# Altium PCB ZZ_KOM_ACB23_4009.PcbDoc (part 3 of 3)
Units mil, origin at the board's own origin, x right, y up, seen from the top; angles counter-clockwise.
Board outline 3937.01 x 2755.91 mil, 4 copper layers (Top Layer, Signal Layer 1, Signal Layer 2, Bottom Layer), stack 63.662 mil thick; 118 components, 212 nets, 909 pads, 347 vias.
Unrouted connection lines stored in the file: 40.
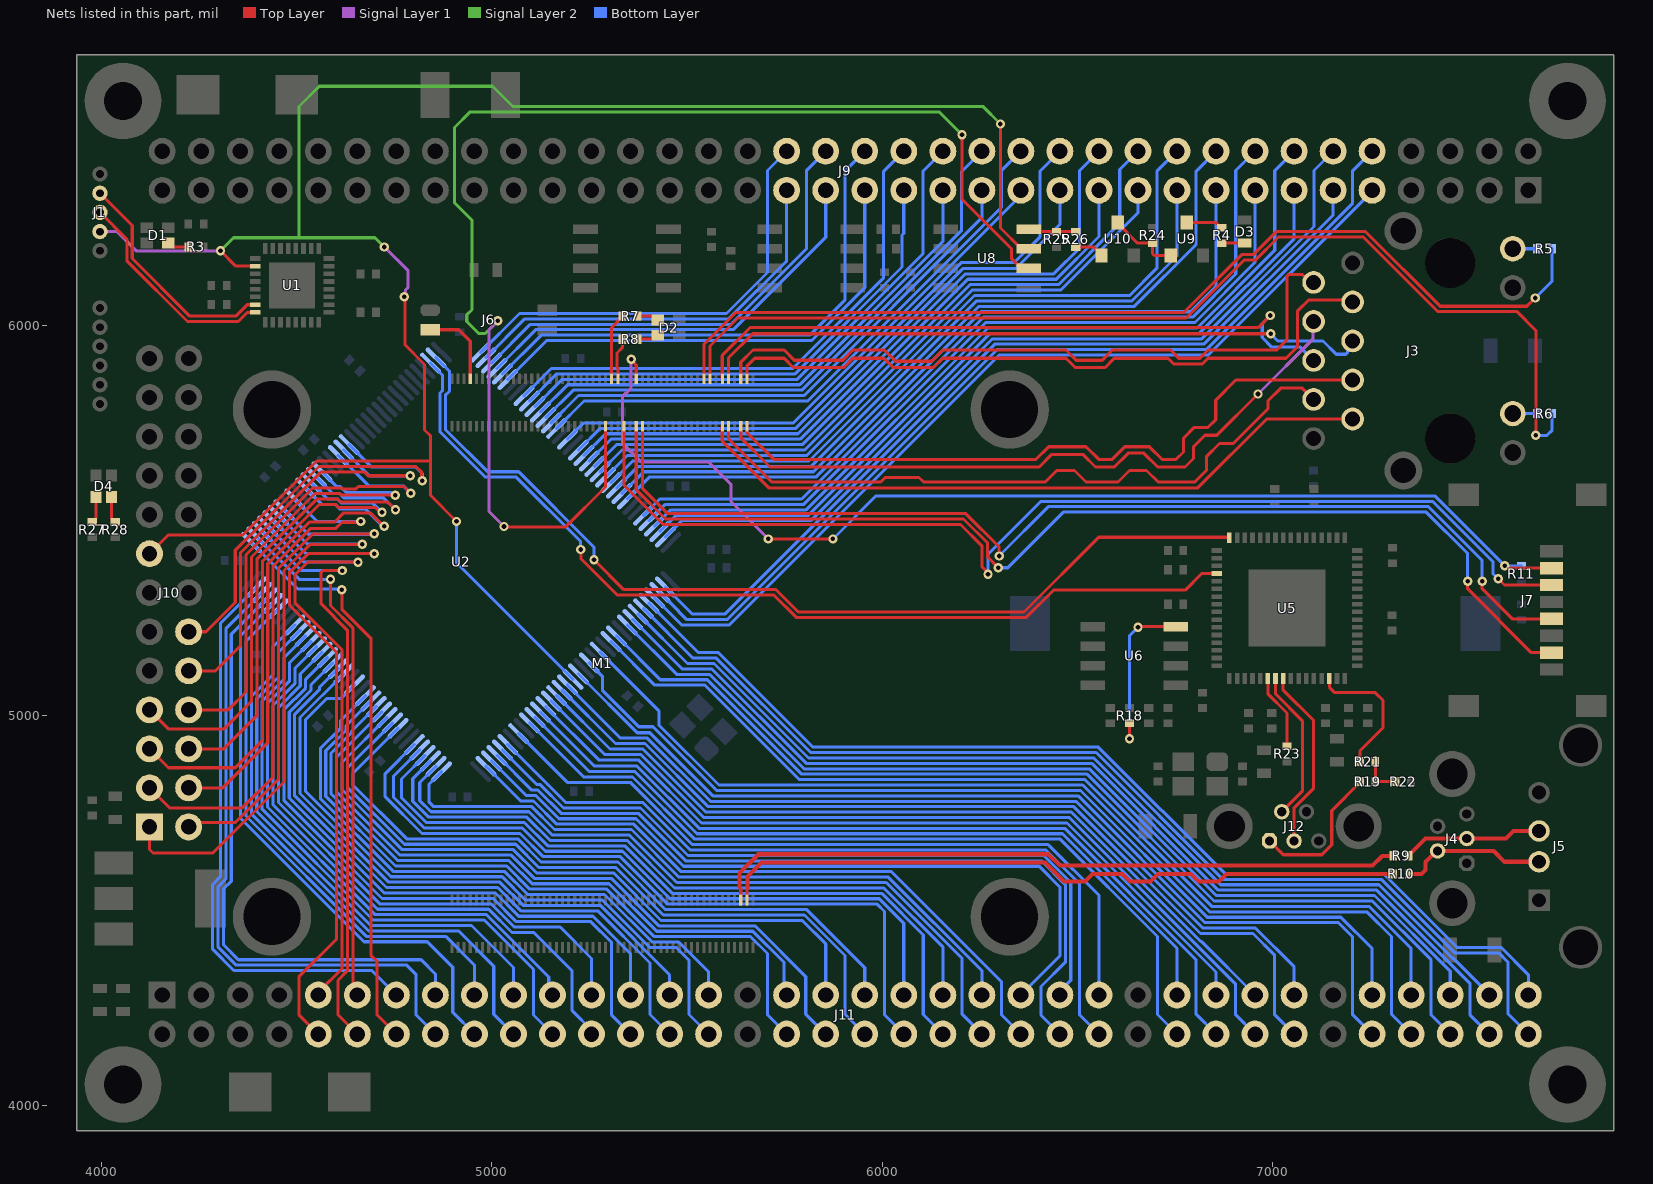
[diagram p5: the nets of this part, all layers, seen from the top]

## Via types
v1: diameter 24.02, hole 11.81, Top Layer to Bottom Layer, tented both sides, 347 vias

## Nets (pads, with @x,y where several pads share a name; then routed paths per layer and width w, separated by ;. In a path a pad name is that pad's centre, name@x,y a point inside that pad or via, vN(x,y) a via of type N, cw(c..) or ccw(c..) an arc to the next point about the centre after c; other vN are vias at no path point) (continued)
NetD1_4: D1.4 R3.2 | length 55.3
  Top Layer w7.87: D1.4@4171.26,6210.63 4181.1,6200.79 R3.2@4222.44,6200.79
NetD2_3: D2.3 R8.2 | length 55.3
  Top Layer w7.87: R8.2@5374.02,5964.57 5415.35,5964.57 D2.3@5425.2,5974.41
NetD2_4: D2.4 R7.2 | length 55.3
  Top Layer w7.87: R7.2@5374.02,6023.62 5415.35,6023.62 D2.4@5425.2,6013.78
NetD3_2: D3.2 R4.1 | length 59.1
  Top Layer w7.87: R4.1@6870.08,6210.63 D3.2@6929.13,6210.63
NetD4_3: D4.3 R28.2 | length 69.3
  Top Layer w7.87: D4.3@4025.59,5560.22 4025.59,5505.95 4027.56,5503.98 4027.56,5502.02 4033.46,5496.11 R28.2@4035.43,5496.11
NetD4_4: D4.4 R27.2 | length 69.3
  Top Layer w7.87: R27.2@3976.38,5496.11 3978.35,5496.11 3984.25,5502.02 3984.25,5503.98 3986.22,5505.95 D4.4@3986.22,5560.22
NetJ3_12: J3.12 R6.2 | length 61.4
  Bottom Layer w7.87: J3.12@7615.75,5773.82 R6.2@7677.17,5773.82
NetJ3_14: J3.14 R5.2 | length 61.4
  Bottom Layer w7.87: J3.14@7615.75,6196.26 R5.2@7677.17,6196.26
NetJ4_2: J4.2 J5.2 R10.2 | length 382.2
  Top Layer w10.63: R10.2@7349.21,4594.49 7381.89,4594.49 7391.95,4604.55 7391.95,4625.59 7419.91,4653.54 J4.2@7423.23,4653.54 7566.93,4653.54 7594.88,4625.59 J5.2@7683.07,4625.59
NetJ4_3: J4.3 J5.3 R9.2 | length 361.3
  Top Layer w10.63: R9.2@7349.21,4640.84 7349.21,4642.81 7353.74,4647.34 7354.25,4647.34 7391.95,4685.04 J4.3@7498.03,4685.04 7537.4,4685.04 7598.43,4685.04 7617.72,4704.33 J5.3@7683.07,4704.33
NetJ6_L2: J6.L2 M1.93 | length 211.3
  Top Layer w7.87: J6.L2@4842.13,5988.78 4915.53,5988.78 4944.88,5959.43 M1.93@4944.88,5862.99
NetJ9_9: J9.9 U2.40 | length 2330.4
  Bottom Layer w7.87: U2.40@5416.79,5301.83 5486.39,5232.24 5608.29,5232.24 6299.97,5923.91 6835.88,5923.91 7255.51,6343.55 J9.9@7255.51,6346.06
NetJ9_10: J9.10 U2.39 | length 2399.7
  Bottom Layer w7.87: U2.39@5430.71,5315.75 5479.32,5267.14 5479.32,5266.42 5499.63,5246.11 5602.54,5246.11 6294.22,5937.79 6830.13,5937.79 7205.51,6313.17 7205.51,6396.06 J9.10@7255.51,6446.06
NetJ9_11: J9.11 U2.38 | length 2226.7
  Bottom Layer w7.87: U2.38@5444.63,5329.67 5514.32,5259.98 5596.8,5259.98 6288.47,5951.66 6824.39,5951.66 7155.51,6282.79 J9.11@7155.51,6346.06
NetJ9_12: J9.12 U2.35 | length 2204.4
  Bottom Layer w7.87: U2.35@5444.63,5457.73 5486.57,5499.67 5816.86,5499.67 6282.73,5965.54 6818.64,5965.54 7106.3,6253.2 7106.3,6396.85 J9.12@7155.51,6446.06
NetJ9_13: J9.13 U2.34 | length 2059.7
  Bottom Layer w7.87: U2.34@5430.71,5471.65 5472.61,5513.54 5811.12,5513.54 6276.98,5979.41 6812.89,5979.41 7055.51,6222.03 J9.13@7055.51,6346.06
NetJ9_14: J9.14 U2.33 | length 2156.3
  Bottom Layer w7.87: U2.33@5416.79,5485.57 5458.64,5527.42 5805.37,5527.42 6271.23,5993.28 6807.15,5993.28 7005.91,6192.04 7005.91,6396.46 J9.14@7055.51,6446.06
NetJ9_15: J9.15 U2.32 | length 2011.6
  Bottom Layer w7.87: U2.32@5402.87,5499.49 5444.68,5541.29 5799.62,5541.29 6265.49,6007.16 6801.4,6007.16 6955.51,6161.27 J9.15@6955.51,6346.06
NetJ9_16: J9.16 U2.31 | length 2108.2
  Bottom Layer w7.87: U2.31@5388.95,5513.41 5430.71,5555.17 5793.88,5555.17 6259.74,6021.03 6795.65,6021.03 6906,6131.38 6906,6396.55 J9.16@6955.51,6446.06
NetJ9_17: J9.17 U2.28 | length 1979.8
  Bottom Layer w7.87: U2.28@5347.19,5555.17 5403.01,5610.98 5830.07,5610.98 6253.99,6034.91 6789.91,6034.91 6855.51,6100.51 J9.17@6855.51,6346.06
NetJ9_18: J9.18 U2.27 | length 1995.6
  Bottom Layer w7.87: U2.27@5333.27,5569.09 5389.04,5624.85 5824.32,5624.85 6248.25,6048.78 6646.12,6048.78 6804.63,6207.28 6804.63,6395.18 J9.18@6855.51,6446.06
NetJ9_19: J9.19 U2.26 | length 1850.8
  Bottom Layer w7.87: U2.26@5319.36,5583.01 5375.08,5638.73 5818.58,5638.73 6242.5,6062.65 6640.38,6062.65 6755.51,6177.79 J9.19@6755.51,6346.06
NetJ9_20: J9.20 U2.25 | length 1947.5
  Bottom Layer w7.87: U2.25@5305.44,5596.92 5361.11,5652.6 5812.83,5652.6 6236.75,6076.53 6634.63,6076.53 6704,6145.9 6704,6394.55 J9.20@6755.51,6446.06
NetJ9_21: J9.21 U2.24 | length 1702.4
  Bottom Layer w7.87: U2.24@5291.52,5610.84 5347.33,5666.66 5807.26,5666.66 6231.01,6090.4 6457.64,6090.4 6655.51,6288.27 J9.21@6655.51,6346.06
NetJ9_22: J9.22 U2.23 | length 1799
  Bottom Layer w7.87: U2.23@5277.6,5624.76 5333.37,5680.53 5801.52,5680.53 6225.26,6104.28 6451.9,6104.28 6608.87,6261.25 6608.87,6399.42 J9.22@6655.51,6446.06
NetJ9_23: J9.23 U2.22 | length 1654.3
  Bottom Layer w7.87: U2.22@5263.68,5638.68 5319.4,5694.41 5795.77,5694.41 6219.51,6118.15 6446.15,6118.15 6555.51,6227.51 J9.23@6555.51,6346.06
NetJ9_24: J9.24 U2.21 | length 1750.6
  Bottom Layer w7.87: U2.21@5249.76,5652.6 5305.44,5708.28 5790.02,5708.28 6213.77,6132.02 6439.88,6132.02 6506,6198.15 6506,6396.55 J9.24@6555.51,6446.06
NetJ9_25: J9.25 U2.20 | length 1552.6
  Bottom Layer w7.87: U2.20@5235.84,5666.52 5291.65,5722.34 5784.46,5722.34 6208.02,6145.9 6343.24,6145.9 6455.51,6258.17 J9.25@6455.51,6346.06
NetJ9_26: J9.26 U2.19 | length 1649.3
  Bottom Layer w7.87: U2.19@5221.92,5680.44 5277.69,5736.21 5778.71,5736.21 6203.77,6161.27 6338.99,6161.27 6405,6227.28 6405,6395.55 J9.26@6455.51,6446.06
NetJ9_27: J9.27 U2.17 | length 1433.5
  Bottom Layer w7.87: U2.17@5194.08,5708.28 5235.88,5750.08 5772.97,5750.08 6355.51,6332.63 J9.27@6355.51,6346.06
NetJ9_28: J9.28 U2.15 | length 1538.3
  Bottom Layer w7.87: U2.15@5166.24,5736.12 5236.32,5806.2 5809.46,5806.2 6305.23,6301.96 6305.23,6395.78 J9.28@6355.51,6446.06
NetJ9_29: J9.29 U2.14 | length 1391.5
  Bottom Layer w7.87: U2.14@5152.32,5750.04 5222.36,5820.07 5800.17,5820.07 6255.51,6275.41 J9.29@6255.51,6346.06
NetJ9_30: J9.30 U2.13 | length 1488.1
  Bottom Layer w7.87: U2.13@5138.4,5763.96 5208.39,5833.94 5794.43,5833.94 6203.77,6243.29 6203.77,6394.32 J9.30@6255.51,6446.06
NetJ9_31: J9.31 U2.12 | length 1343.4
  Bottom Layer w7.87: U2.12@5124.48,5777.88 5194.43,5847.82 5788.68,5847.82 6155.51,6214.65 J9.31@6155.51,6346.06
NetJ9_32: J9.32 U2.11 | length 1440
  Bottom Layer w7.87: U2.11@5110.56,5791.8 5180.46,5861.69 5782.93,5861.69 6104.62,6183.38 6104.62,6395.17 J9.32@6155.51,6446.06
NetJ9_33: J9.33 U2.10 | length 1295.3
  Bottom Layer w7.87: U2.10@5096.64,5805.72 5166.5,5875.57 5777.19,5875.57 6050.89,6149.27 6050.89,6231.26 6055.51,6235.88 J9.33@6055.51,6346.06
NetJ9_34: J9.34 U2.9 | length 1391.9
  Bottom Layer w7.87: U2.9@5082.73,5819.64 5152.53,5889.44 5771.44,5889.44 6004,6122 6004,6394.55 J9.34@6055.51,6446.06
NetJ9_35: J9.35 U2.6 | length 1261.5
  Bottom Layer w7.87: U2.6@5040.97,5861.39 5140.63,5961.06 5820.07,5961.06 5955.51,6096.5 J9.35@5955.51,6346.06
NetJ9_36: J9.36 U2.5 | length 1358.2
  Bottom Layer w7.87: U2.5@5027.05,5875.31 5126.66,5974.93 5814.33,5974.93 5905.18,6065.78 5905.18,6395.73 J9.36@5955.51,6446.06
NetJ9_37: J9.37 U2.4 | length 1102.1
  Bottom Layer w7.87: U2.4@5013.13,5889.23 5112.7,5988.8 5618.61,5988.8 5855.51,6225.7 J9.37@5855.51,6346.06
NetJ9_38: J9.38 U2.3 | length 1198.8
  Bottom Layer w7.87: U2.3@4999.21,5903.15 5098.73,6002.68 5612.87,6002.68 5805.84,6195.65 5805.84,6396.39 J9.38@5855.51,6446.06
NetJ9_39: J9.39 U2.2 | length 1054
  Bottom Layer w7.87: U2.2@4985.29,5917.07 5084.77,6016.55 5607.12,6016.55 5755.51,6164.94 J9.39@5755.51,6346.06
NetJ9_40: J9.40 U2.1 | length 1150.7
  Bottom Layer w7.87: U2.1@4971.37,5930.99 5070.8,6030.43 5601.37,6030.43 5706.34,6135.39 5706.34,6396.89 J9.40@5755.51,6446.06
NetJ10_1: J10.1 U2.114 | length 1496.4
  Top Layer w7.87: J10.1@4123.22,4714.96 4123.22,4657.03 4132.26,4648 4285.5,4648 4467.56,4830.07 4467.56,5372 4534.52,5438.95 4667.72,5438.95 v1(4667.78,5438.89)
  Bottom Layer w7.87: U2.114@4453.57,5513.41 4527.09,5439.88 4643.96,5439.88 ; 4643.96,5439.87 4666.8,5439.87 v1(4667.78,5438.89)
NetJ10_2: J10.2 U2.115 | length 1360.3
  Top Layer w7.87: J10.2@4223.22,4714.96 4234.54,4726.27 4342.7,4726.27 4453.69,4837.26 4453.69,5377.74 4541.82,5465.88 v1(4698.54,5465.88)
  Bottom Layer w7.87: U2.115@4467.49,5527.33 4529.98,5464.83 4697.5,5464.83 v1(4698.54,5465.88)
NetJ10_3: J10.3 U2.117 | length 1375.9
  Top Layer w7.87: J10.3@4123.22,4814.96 4174.41,4763.78 4360.52,4763.78 4439.82,4843.07 4439.82,5383.49 4536.08,5479.75 4600.44,5479.75 4616.28,5495.59 4662.42,5495.59 v1(4664.42,5497.59)
  Bottom Layer w7.87: U2.117@4495.33,5555.17 4552.9,5497.59 v1(4664.42,5497.59)
NetJ10_4: J10.4 U2.119 | length 1317.6
  Top Layer w7.87: J10.4@4223.22,4814.96 4310.58,4814.96 4425.94,4930.32 4425.94,5389.24 4532.51,5495.8 4596.87,5495.8 4620.6,5519.54 4688.96,5519.54 4722.92,5485.57 v1(4724.44,5485.57)
  Bottom Layer w7.87: U2.119@4523.16,5583.01 4564.69,5541.48 4598.66,5541.48 4609.94,5530.2 4675.52,5530.2 4720.14,5485.57 v1(4724.44,5485.57)
NetJ10_5: J10.5 U2.120 | length 1385.7
  Top Layer w7.87: J10.5@4123.22,4914.96 4171.71,4866.48 4342.48,4866.48 4412.07,4936.07 4412.07,5394.98 4558.57,5541.48 4598.66,5541.48 4606.73,5533.41 4701.75,5533.41 4714.33,5520.83 v1(4718.69,5520.83)
  Bottom Layer w7.87: U2.120@4537.08,5596.92 4578.65,5555.35 4604.4,5555.35 4615.32,5544.44 4695.09,5544.44 v1(4718.69,5520.83)
NetJ10_6: J10.6 U2.121 | length 1278.4
  Top Layer w7.87: J10.6@4223.22,4914.96 4313.47,4914.96 4398.19,4999.68 4398.19,5400.73 4552.82,5555.35 4604.4,5555.35 4612.48,5547.28 4733.31,5547.28 v1(4753.17,5527.42)
  Bottom Layer w7.87: U2.121@4551,5610.84 4592.62,5569.23 4610.15,5569.23 4621.06,5558.31 4722.28,5558.31 v1(4753.17,5527.42)
NetJ10_7: J10.7 U2.122 | length 1329.9
  Top Layer w7.87: J10.7@4123.22,5014.96 4172.6,4965.58 4313.01,4965.58 4384.32,5036.89 4384.32,5406.48 4547.07,5569.23 4610.15,5569.23 4614.36,5565.02 v1(4752.3,5565.02)
  Bottom Layer w7.87: U2.122@4564.92,5624.76 4602.85,5586.84 4612.16,5586.84 4626.81,5572.19 4740.77,5572.19 4747.93,5565.02 v1(4752.3,5565.02)
NetJ10_8: J10.8 U2.125 | length 1246.1
  Top Layer w7.87: J10.8@4223.22,5014.96 4324.64,5014.96 4370.45,5060.76 4370.45,5412.22 4541.33,5583.1 4615.9,5583.1 4618.26,5580.74 4651.8,5580.74 4658.03,5586.97 4775.24,5586.97 v1(4792.15,5570.06)
  Bottom Layer w7.87: U2.125@4606.68,5666.52 4684.56,5588.64 4773.56,5588.64 v1(4792.15,5570.06)
NetJ10_10: J10.10 U2.126 | length 1120.2
  Top Layer w7.87: J10.10@4223.22,5114.96 4291.96,5114.96 4356.57,5179.57 4356.57,5417.97 4563.23,5624.63 4673.55,5624.63 4683.56,5614.61 v1(4790.96,5614.61)
  Bottom Layer w7.87: U2.126@4620.6,5680.44 4686.41,5614.63 v1@4790.94,5614.63
NetJ10_12: J10.12 U2.127 | length 1116.4
  Top Layer w7.87: J10.12@4223.22,5214.96 4267.96,5214.96 4342.7,5289.7 4342.7,5423.72 4557.48,5638.5 4805.4,5638.5 4820.3,5623.6 4820.3,5602.87 v1(4821.37,5601.8)
  Bottom Layer w7.87: U2.127@4634.52,5694.36 4692.32,5636.56 4805.79,5636.56 4821.99,5620.36 4821.99,5602.42 v1(4821.37,5601.8)
NetJ11_9: J11.9 U2.112 | length 1597.3
  Top Layer w7.87: J11.9@4555.51,4284.25 4555.51,4291.13 4616.2,4351.82 4616.2,5168.57 4495.31,5289.46 4495.31,5360.5 4528.51,5393.7 4656.39,5393.7 v1(4657.19,5392.89)
  Bottom Layer w7.87: U2.112@4425.73,5485.57 4517.6,5393.7 4656.39,5393.7 v1(4657.19,5392.89)
NetJ11_10: J11.10 U2.113 | length 1823.9
  Top Layer w7.87: J11.10@4555.51,4184.25 4505.73,4234.03 4505.73,4330.73 4602.33,4427.33 4602.33,5162.83 4481.44,5283.72 4481.44,5366.25 4530.15,5414.96 v1(4698.54,5414.96)
  Bottom Layer w7.87: U2.113@4439.65,5499.49 4524.18,5414.96 v1(4698.54,5414.96)
NetJ11_11: J11.11 U2.110 | length 1327.3
  Top Layer w7.87: v1@4586.6,5349.19 4586.6,5282.27 4643.95,5224.92 4643.95,4295.81 J11.11@4655.51,4284.25
  Bottom Layer w7.87: U2.110@4397.89,5457.73 4506.43,5349.19 v1(4586.76,5349.19)
NetJ11_12: J11.12 U2.111 | length 1543.6
  Top Layer w7.87: v1(4616.89,5371.76) 4567.47,5371.76 4562.85,5367.14 4562.85,5286.4 4630.08,5219.17 4630.08,4346.08 4606.02,4322.02 4606.02,4233.74 J11.12@4655.51,4184.25
  Bottom Layer w7.87: U2.111@4411.81,5471.65 4511.7,5371.76 v1(4616.89,5371.76)
NetJ11_13: J11.13 U2.107 | length 1494.2
  Bottom Layer w7.87: U2.107@4397.89,5329.67 4330.71,5262.49 4330.71,5262.19 4304.66,5236.14 4304.66,4587.35 4284.97,4567.66 4284.97,4401.24 4339.25,4346.96 4692.8,4346.96 J11.13@4755.51,4284.25
NetJ11_14: J11.14 U2.109 | length 1478.5
  Top Layer w7.87: v1(4615.9,5322.83) 4615.9,5272.59 4690,5198.49 4690,4386.53 4706.45,4370.08 4706.45,4233.32 J11.14@4755.51,4184.25
  Bottom Layer w7.87: U2.109@4383.97,5443.81 4503.21,5324.57 4614.16,5324.57 v1(4615.9,5322.83)
NetJ11_15: J11.15 U2.105 | length 1563.5
  Bottom Layer w7.87: U2.105@4425.73,5301.83 4332.41,5208.51 4332.41,4575.86 4312.72,4556.17 4312.72,4412.74 4350.75,4374.71 4818.99,4374.71 4855.51,4338.19 J11.15@4855.51,4284.25
NetJ11_16: J11.16 U2.106 | length 1665.1
  Bottom Layer w7.87: U2.106@4411.81,5315.75 4318.53,5222.48 4318.53,4581.61 4298.84,4561.92 4298.84,4406.99 4345,4360.83 4782.37,4360.83 4805.32,4337.88 4805.32,4234.44 J11.16@4855.51,4184.25
NetJ11_17: J11.17 U2.103 | length 1385.8
  Bottom Layer w7.87: U2.103@4453.57,5273.99 4432.69,5253.11 4370.1,5190.52 4370.1,4743.04 4678.47,4434.67 4881.68,4434.67 4955.51,4360.83 J11.17@4955.51,4284.25
NetJ11_18: J11.18 U2.104 | length 1481.2
  Bottom Layer w7.87: U2.104@4439.65,5287.91 4356.22,5204.49 4356.22,4737.29 4559.26,4534.26 4672.72,4420.8 4834.49,4420.8 4899.9,4355.39 4899.9,4239.87 J11.18@4955.51,4184.25
NetJ11_19: J11.19 U2.99 | length 1403.8
  Bottom Layer w7.87: U2.99@4509.24,5218.32 4453.57,5162.64 4453.57,5104.02 4453.52,5103.98 4453.52,5099.17 4397.84,5043.49 4397.84,4754.53 4689.96,4462.42 4948.1,4462.42 5055.51,4355.01 J11.19@5055.51,4284.25
NetJ11_20: J11.20 U2.100 | length 1507.2
  Bottom Layer w7.87: U2.100@4495.33,5232.24 4439.65,5176.56 4439.65,5104.91 4383.97,5049.24 4383.97,4748.79 4684.21,4448.54 4914.52,4448.54 5005.04,4358.02 5005.04,4234.72 J11.20@5055.51,4184.25
NetJ11_21: J11.21 U2.97 | length 1421.6
  Bottom Layer w7.87: U2.97@4537.08,5190.48 4481.36,5134.75 4481.36,5087.76 4425.59,5032 4425.59,4766.03 4701.45,4490.17 4986.29,4490.17 5145.95,4330.51 5145.95,4293.82 J11.21@5155.51,4284.25
NetJ11_22: J11.22 U2.98 | length 1541.3
  Bottom Layer w7.87: U2.98@4523.16,5204.4 4467.49,5148.72 4467.49,5093.51 4411.72,5037.74 4411.72,4760.28 4695.71,4476.29 4980.55,4476.29 5106.76,4350.08 5106.76,4233.01 J11.22@5155.51,4184.25
NetJ11_23: J11.23 U2.95 | length 1492.8
  Bottom Layer w7.87: U2.95@4564.92,5162.64 4509.2,5106.92 4509.2,5076.36 4453.34,5020.5 4453.34,4777.52 4712.95,4517.91 4997.79,4517.91 5057.28,4458.42 5175.17,4458.42 5255.51,4378.07 J11.23@5255.51,4284.25
NetJ11_24: J11.24 U2.96 | length 1576.1
  Bottom Layer w7.87: U2.96@4551,5176.56 4495.33,5120.88 4495.33,5082.11 4439.47,5026.25 4439.47,4771.77 4707.2,4504.04 4992.04,4504.04 5051.83,4444.25 5107.72,4444.25 5205.96,4346.01 5205.96,4244.15 5255.51,4194.6 J11.24@5255.51,4184.25
NetJ11_25: J11.25 U2.93 | length 1537.6
  Bottom Layer w7.87: U2.93@4592.76,5134.8 4536.95,5078.99 4536.95,5064.87 4481.09,5009.01 4481.09,4789.01 4724.44,4545.66 5009.28,4545.66 5068.77,4486.17 5259.5,4486.17 5355.51,4390.16 J11.25@5355.51,4284.25
NetJ11_26: J11.26 U2.94 | length 1657.2
  Bottom Layer w7.87: U2.94@4578.84,5148.72 4523.07,5092.95 4523.07,5070.62 4467.21,5014.76 4467.21,4783.27 4718.69,4531.79 5003.53,4531.79 5063.03,4472.29 5253.76,4472.29 5306.97,4419.07 5306.97,4232.79 J11.26@5355.51,4184.25
NetJ11_27: J11.27 U2.91 | length 1543.5
  Bottom Layer w7.87: U2.91@4620.6,5106.96 4508.84,4995.2 4508.84,4800.51 4735.93,4573.41 5020.77,4573.41 5080.27,4513.91 5277.49,4513.91 5455.51,4335.89 J11.27@5455.51,4284.25
NetJ11_28: J11.28 U2.92 | length 1663.2
  Bottom Layer w7.87: U2.92@4606.68,5120.88 4559.07,5073.27 4559.07,5067.37 4494.96,5003.26 4494.96,4794.76 4730.19,4559.54 5015.03,4559.54 5074.52,4500.04 5271.74,4500.04 5405.41,4366.38 5405.41,4234.36 J11.28@5455.51,4184.25
NetJ11_29: J11.29 U2.87 | length 1549.2
  Bottom Layer w7.87: U2.87@4676.28,5051.28 4612.81,4987.81 4612.81,4967.9 4560.71,4915.8 4560.71,4787.88 4747.43,4601.16 5032.27,4601.16 5091.76,4541.66 5288.98,4541.66 5410.75,4419.9 5478.7,4419.9 5555.51,4343.09 J11.29@5555.51,4284.25
NetJ11_30: J11.30 U2.89 | length 1718.1
  Bottom Layer w7.87: U2.89@4648.44,5079.12 4612.81,5043.49 4576.75,5043.49 4522.71,4989.45 4522.71,4806.25 4741.68,4587.28 5026.52,4587.28 5086.01,4527.79 5283.24,4527.79 5405,4406.03 5472.95,4406.03 5505.28,4373.7 5505.28,4234.49 J11.30@5555.51,4184.25
NetJ11_33: J11.33 U2.85 | length 1697.2
  Bottom Layer w7.87: U2.85@4704.12,5023.44 4640.56,4959.88 4640.56,4956.41 4588.45,4904.31 4588.45,4799.37 4758.92,4628.91 5043.76,4628.91 5103.25,4569.41 5300.48,4569.41 5422.24,4447.65 5668.65,4447.65 5748.92,4367.38 5748.92,4290.84 J11.33@5755.51,4284.25
NetJ11_34: J11.34 U2.86 | length 1816.9
  Bottom Layer w7.87: U2.86@4690.2,5037.36 4626.68,4973.85 4626.68,4962.16 4574.58,4910.05 4574.58,4793.63 4753.17,4615.03 5038.01,4615.03 5097.51,4555.54 5294.73,4555.54 5416.49,4433.77 5662.91,4433.77 5706.19,4390.49 5706.19,4233.58 J11.34@5755.51,4184.25
NetJ11_35: J11.35 U2.83 | length 1766.9
  Bottom Layer w7.87: U2.83@4731.96,4995.61 4616.2,4879.85 4616.2,4810.87 4770.41,4656.65 5055.25,4656.65 5114.75,4597.16 5311.97,4597.16 5433.73,4475.4 5795.38,4475.4 5855.51,4415.26 J11.35@5855.51,4284.25
NetJ11_36: J11.36 U2.84 | length 1819
  Bottom Layer w7.87: U2.84@4718.04,5009.52 4602.33,4893.82 4602.33,4805.12 4764.67,4642.78 5049.51,4642.78 5109,4583.28 5306.22,4583.28 5427.99,4461.52 5674.4,4461.52 5804.42,4331.51 5804.42,4235.35 J11.36@5855.51,4184.25
NetJ11_37: J11.37 U2.81 | length 1769
  Bottom Layer w7.87: U2.81@4759.79,4967.77 4643.95,4851.92 4643.95,4822.36 4781.91,4684.4 5066.75,4684.4 5126.24,4624.91 5323.46,4624.91 5445.23,4503.14 5806.87,4503.14 5955.51,4354.5 J11.37@5955.51,4284.25
NetJ11_38: J11.38 U2.82 | length 1888.6
  Bottom Layer w7.87: U2.82@4745.88,4981.69 4630.08,4865.89 4630.08,4816.61 4776.16,4670.53 5061,4670.53 5120.49,4611.03 5317.72,4611.03 5439.48,4489.27 5801.12,4489.27 5904.86,4385.53 5904.86,4234.9 J11.38@5955.51,4184.25
NetJ11_39: J11.39 U2.77 | length 1773.8
  Bottom Layer w7.87: U2.77@4815.47,4912.09 4748.62,4845.24 4748.62,4790.35 4826.82,4712.15 5078.24,4712.15 5137.73,4652.65 5334.96,4652.65 5456.72,4530.89 5993.06,4530.89 6055.51,4468.44 J11.39@6055.51,4284.25
NetJ11_40: J11.40 U2.78 | length 1900
  Bottom Layer w7.87: U2.78@4801.55,4926.01 4726.85,4851.3 4726.85,4792.5 4821.07,4698.28 5072.49,4698.28 5131.99,4638.78 5329.21,4638.78 5450.97,4517.02 5987.31,4517.02 6005.93,4498.4 6005.93,4233.83 J11.40@6055.51,4184.25
NetJ11_41: J11.41 U2.75 | length 1758.4
  Bottom Layer w7.87: U2.75@4843.31,4884.25 4797.59,4838.52 4797.59,4780.62 4838.31,4739.9 5089.73,4739.9 5149.23,4680.4 5346.45,4680.4 5468.21,4558.64 6004.55,4558.64 6155.51,4407.68 J11.41@6155.51,4284.25
NetJ11_42: J11.42 U2.76 | length 1890.4
  Bottom Layer w7.87: U2.76@4829.39,4898.17 4768.85,4837.63 4768.85,4789.74 4832.57,4726.02 5083.99,4726.02 5143.48,4666.53 5340.7,4666.53 5462.47,4544.77 5998.81,4544.77 6105.36,4438.21 6105.36,4234.4 J11.42@6155.51,4184.25
NetJ11_43: J11.43 U2.73 | length 1748.8
  Bottom Layer w7.87: U2.73@4871.15,4856.41 4839.43,4824.7 4839.43,4778.02 4849.81,4767.65 5101.23,4767.65 5160.72,4708.15 5357.94,4708.15 5479.71,4586.39 6016.05,4586.39 6255.51,4346.92 J11.43@6255.51,4284.25
NetJ11_44: J11.44 U2.74 | length 1876.8
  Bottom Layer w7.87: U2.74@4857.23,4870.33 4815.47,4828.57 4815.47,4782.36 4844.06,4753.77 5095.48,4753.77 5154.97,4694.28 5352.2,4694.28 5473.96,4572.51 6010.3,4572.51 6205.01,4377.8 6205.01,4234.75 J11.44@6255.51,4184.25
NetJ11_45: J11.45 U2.70 | length 1908.4
  Bottom Layer w7.87: U2.70@4999.21,4884.25 5088.07,4795.39 5112.72,4795.39 5172.22,4735.9 5369.44,4735.9 5491.2,4614.14 6402.48,4614.14 6455.51,4561.11 6455.51,4384.25 J11.45@6355.51,4284.25
NetJ11_46: J11.46 U2.71 | length 1704
  Bottom Layer w7.87: U2.71@4985.29,4870.33 5074.1,4781.52 5106.97,4781.52 5166.47,4722.02 5363.69,4722.02 5485.45,4600.26 6024.23,4600.26 6305.53,4318.96 6305.53,4234.23 J11.46@6355.51,4184.25
NetJ11_47: J11.47 U2.68 | length 1896.7
  Bottom Layer w7.87: U2.68@5027.05,4912.09 5115.99,4823.14 5124.21,4823.14 5183.71,4763.65 5380.93,4763.65 5502.69,4641.88 6413.98,4641.88 6483.26,4572.6 6483.26,4321.93 6455.51,4294.18 J11.47@6455.51,4284.25
NetJ11_48: J11.48 U2.69 | length 2022
  Bottom Layer w7.87: U2.69@5013.13,4898.17 5102.03,4809.27 5118.47,4809.27 5177.96,4749.77 5375.18,4749.77 5496.95,4628.01 6408.23,4628.01 6469.39,4566.86 6469.39,4368.28 6407.01,4305.9 6407.01,4232.76 J11.48@6455.51,4184.25
NetJ11_49: J11.49 U2.65 | length 1913.6
  Bottom Layer w7.87: U2.65@5068.81,4953.85 5193.59,4829.06 5354.76,4829.06 5514.19,4669.63 6425.47,4669.63 6555.51,4539.59 J11.49@6555.51,4284.25
NetJ11_50: J11.50 U2.67 | length 2018.4
  Bottom Layer w7.87: U2.67@5040.97,4926.01 5189.46,4777.52 5386.68,4777.52 5508.44,4655.76 6419.72,4655.76 6505.38,4570.1 6505.38,4234.38 J11.50@6555.51,4184.25
NetJ11_53: J11.53 U2.62 | length 2009.7
  Bottom Layer w7.87: U2.62@5110.56,4995.61 5249.36,4856.81 5366.25,4856.81 5525.68,4697.38 6462.11,4697.38 6755.51,4403.98 J11.53@6755.51,4284.25
NetJ11_54: J11.54 U2.63 | length 2106.4
  Bottom Layer w7.87: U2.63@5096.64,4981.69 5235.39,4842.94 5360.5,4842.94 5519.93,4683.51 6456.37,4683.51 6705.46,4434.41 6705.46,4234.3 J11.54@6755.51,4184.25
NetJ11_55: J11.55 U2.60 | length 2058.5
  Bottom Layer w7.87: U2.60@5138.4,5023.44 5138.4,5022.38 5273.86,4886.92 5375.38,4886.92 5537.17,4725.13 6473.61,4725.13 6855.51,4343.22 J11.55@6855.51,4284.25
NetJ11_56: J11.56 U2.61 | length 2154.5
  Bottom Layer w7.87: U2.61@5124.48,5009.52 5263.32,4870.68 5372,4870.68 5531.43,4711.25 6467.86,4711.25 6803.69,4375.42 6803.69,4236.07 J11.56@6855.51,4184.25
NetJ11_57: J11.57 U2.58 | length 2107
  Bottom Layer w7.87: U2.58@5166.24,5051.28 5302.86,4914.67 5386.87,4914.67 5548.67,4752.88 6485.1,4752.88 6816.91,4421.07 6818.69,4421.07 J11.57@6955.51,4284.25
NetJ11_58: J11.58 U2.59 | length 2202.6
  Bottom Layer w7.87: U2.59@5152.32,5037.36 5288.89,4900.8 5381.13,4900.8 5542.92,4739 6479.35,4739 6904.87,4313.49 6904.87,4234.9 J11.58@6955.51,4184.25
NetJ11_59: J11.59 U2.56 | length 2233.6
  Bottom Layer w7.87: U2.56@5194.08,5079.12 5194.08,5078.06 5329.72,4942.42 5398.37,4942.42 5560.16,4780.62 6496.59,4780.62 6821.34,4455.87 6956.07,4455.87 7055.51,4356.43 J11.59@7055.51,4284.25
NetJ11_60: J11.60 U2.57 | length 2329.6
  Bottom Layer w7.87: U2.57@5180.16,5065.2 5316.82,4928.54 5392.62,4928.54 5554.41,4766.75 6490.85,4766.75 6815.6,4442 6950.32,4442 7004.88,4387.44 7004.88,4234.88 J11.60@7055.51,4184.25
NetJ11_63: J11.63 U2.52 | length 2448.9
  Bottom Layer w7.87: U2.52@5249.76,5134.8 5283.24,5101.32 5283.24,5065.26 5376.92,4971.59 5412.97,4971.59 5576.19,4808.37 6508.09,4808.37 6832.84,4483.62 7175.13,4483.62 7255.51,4403.24 J11.63@7255.51,4284.25
NetJ11_64: J11.64 U2.54 | length 2532.6
  Bottom Layer w7.87: U2.54@5221.92,5106.96 5372.59,4956.29 5404.66,4956.29 5566.46,4794.5 6502.34,4794.5 6827.09,4469.75 7169.39,4469.75 7204.72,4434.41 7204.72,4235.04 J11.64@7255.51,4184.25
NetJ11_65: J11.65 U2.48 | length 2495.3
  Bottom Layer w7.87: U2.48@5305.44,5190.48 5417.86,5078.06 5546.36,5078.06 5788.29,4836.12 6519.58,4836.12 6844.33,4511.37 7247.59,4511.37 7355.51,4403.45 J11.65@7355.51,4284.25
NetJ11_66: J11.66 U2.50 | length 2621.2
  Bottom Layer w7.87: U2.50@5277.6,5162.64 5427.99,5012.25 5427.99,4976.19 5581.93,4822.25 6513.83,4822.25 6838.58,4497.5 7241.84,4497.5 7305.09,4434.25 7305.09,4234.68 J11.66@7355.51,4184.25
NetJ11_67: J11.67 U2.45 | length 2536.7
  Bottom Layer w7.87: U2.45@5347.19,5232.24 5473.63,5105.8 5557.85,5105.8 5799.79,4863.87 6531.07,4863.87 6855.82,4539.12 7261.53,4539.12 7455.51,4345.14 J11.67@7455.51,4284.25
NetJ11_68: J11.68 U2.47 | length 2641.5
  Bottom Layer w7.87: U2.47@5319.36,5204.4 5431.82,5091.93 5552.1,5091.93 5794.04,4849.99 6525.33,4849.99 6850.08,4525.24 7255.78,4525.24 7406.47,4374.55 7406.47,4233.29 J11.68@7455.51,4184.25
NetJ11_69: J11.69 U2.43 | length 2586
  Bottom Layer w7.87: U2.43@5375.03,5260.07 5501.56,5133.55 5569.34,5133.55 5811.28,4891.62 6542.57,4891.62 6867.32,4566.87 7273.02,4566.87 7461.34,4378.55 7463.46,4378.55 7555.51,4286.5 J11.69@7555.51,4284.25
NetJ11_70: J11.70 U2.44 | length 2681.4
  Bottom Layer w7.87: U2.44@5361.11,5246.15 5487.59,5119.68 5563.6,5119.68 5805.53,4877.74 6536.82,4877.74 6861.57,4552.99 7267.28,4552.99 7505.72,4314.55 7505.72,4234.04 J11.70@7555.51,4184.25
NetJ11_71: J11.71 U2.41 | length 2698.8
  Bottom Layer w7.87: U2.41@5402.87,5287.91 5529.48,5161.3 5580.84,5161.3 5822.77,4919.36 6554.06,4919.36 6878.81,4594.61 7284.52,4594.61 7472.83,4406.3 7585.41,4406.3 7655.51,4336.2 J11.71@7655.51,4284.25
NetJ11_72: J11.72 U2.42 | length 2795.5
  Bottom Layer w7.87: U2.42@5388.95,5273.99 5515.52,5147.43 5575.09,5147.43 5817.03,4905.49 6548.31,4905.49 6873.06,4580.74 7278.77,4580.74 7467.08,4392.43 7579.67,4392.43 7603.48,4368.61 7603.48,4236.28 J11.72@7655.51,4184.25
NetJ12_1: J12.1 R19.2 | length 376.5
  Top Layer w7.87: J12.1@6992.52,4679.13 7027.95,4643.7 7126.38,4643.7 7151.87,4669.2 7151.87,4756.6 7224.41,4829.13 R19.2@7224.41,4831.1
NetJ12_2: J12.2 U5.7 | length 391.9
  Top Layer w7.87: U5.7@7007.87,5095.47 7007.87,5055.76 7076.77,4986.86 7076.77,4806.69 J12.2@7024.02,4753.94
NetJ12_3: J12.3 U5.8 | length 469.3
  Top Layer w7.87: U5.8@7027.56,5095.47 7027.56,5065.41 7105.51,4987.46 7105.51,4814.33 7055.51,4764.33 J12.3@7055.51,4679.13
NetM1_15: M1.15 R6.1 | length 2773.1
  Top Layer w7.87: M1.15@5559.06,5862.99 5559.06,5946.91 5630.96,6018.82 6778.86,6018.82 6927.17,6167.13 6956.36,6167.13 7015.52,6226.28 7232.83,6226.28 7424.11,6035 7627,6035 7675,5987 v1(7675,5718)
  Bottom Layer w7.87: v1(7675,5718) 7703,5718 7716.54,5731.54 R6.1@7716.54,5773.82
NetM1_17: M1.17 R5.1 | length 2569.6
  Top Layer w7.87: M1.17@5543.31,5862.99 5543.31,5950.79 5625.21,6032.69 6773.11,6032.69 6921.42,6181 6950.61,6181 7009.77,6240.16 7238.57,6240.16 7429.86,6048.87 7651.87,6048.87 v1(7673,6070)
  Bottom Layer w7.87: v1(7673,6070) 7716.54,6113.54 R5.1@7716.54,6196.26
NetM1_45: M1.45 R8.1 | length 108.1
  Top Layer w7.87: M1.45@5322.83,5862.99 5322.83,5890.89 5320.83,5892.89 5320.83,5929.13 5334.65,5942.94 R8.1@5334.65,5964.57
NetM1_47: M1.47 R7.1 | length 172.2
  Top Layer w7.87: M1.47@5307.09,5862.99 5307.09,5887.02 5306.9,5887.21 5306.9,5993.91 5334.65,6021.65 R7.1@5334.65,6023.62
NetR4_2: R4.2 U9.3 | length 95.3
  Top Layer w7.87: U9.3@6780.51,6263.78 6854.33,6263.78 6868.11,6250 R4.2@6870.08,6250
NetR18_2: R18.2 U6.4 | length 430.9
  Top Layer w7.87: v1(6633.86,4940.94) R18.2@6633.86,4980.32 ; v1(6655.51,5226.38) 6657.09,5227.95 U6.4@6751.97,5227.95
  Bottom Layer w7.87: v1(6633.86,4940.94) 6633.86,5204.72 v1(6655.51,5226.38)
NetR19_1: R19.1 R21.1 R22.2 | length 103.1
  Top Layer w7.87: R21.1@7263.78,4882.28 R19.1@7263.78,4831.1 R22.2@7315.75,4831.1
NetR21_2: R21.2 U5.14 | length 355.7
  Top Layer w7.87: U5.14@7145.67,5095.47 7145.67,5073.04 7159.65,5059.06 7263.78,5059.06 7283.46,5039.37 7283.46,4968.9 7224.41,4909.84 R21.2@7224.41,4882.28
NetR23_2: R23.2 U5.6 | length 194.2
  Top Layer w7.87: U5.6@6988.19,5095.47 6988.19,5055.83 7037.4,5006.61 R23.2@7037.4,4921.65
NetR24_1: R24.1 U9.1 U10.3 | length 187.8
  Top Layer w7.87: U10.3@6603.35,6263.78 6603.35,6261.81 6654.53,6210.63 R24.1@6692.91,6210.63 6692.91,6183.75 6697.53,6179.13 U9.1@6739.17,6179.13
NetR25_2: R25.2 R26.1 U8.8 | length 122.6
  Top Layer w7.87: U8.8@6375.98,6246.26 6382.09,6240.16 R25.2@6446.85,6240.16 R26.1@6496.06,6240.16
NetR26_2: R26.2 U10.1 | length 76.1
  Top Layer w7.87: R26.2@6496.06,6200.79 6542.32,6200.79 6562.01,6181.1 U10.1@6562.01,6179.13
NetU2_142: U2.142 U5.52 | length 2450.4
  Top Layer w7.87: v1(5227.59,5425.57) 5228.47,5424.69 5228.47,5401.75 5321.26,5308.96 5722.6,5308.96 5779.69,5251.87 6369.33,5251.87 6439.1,5321.64 6776.37,5321.64 6818.9,5364.17 U5.52@6857.28,5364.17
  Bottom Layer w7.87: U2.142@4843.31,5903.15 4843.31,5902.09 4873.99,5871.41 4873.99,5833.34 4867.21,5826.56 4867.21,5727.47 4983.7,5610.98 5062.97,5610.98 5227.59,5446.35 v1(5227.59,5425.57)
NetU2_143: U2.143 U5.48 | length 2503.5
  Top Layer w7.87: v1(5261.79,5399.46) 5338.42,5322.83 5728.35,5322.83 5785.43,5265.75 6363.58,5265.75 6554.91,5457.08 6888.39,5457.08 U5.48@6889.76,5455.71
  Bottom Layer w7.87: U2.143@4857.23,5917.07 4891.62,5882.68 4891.62,5831.36 4881.08,5820.81 4881.08,5733.22 4989.44,5624.85 5068.72,5624.85 5261.79,5431.78 v1(5261.79,5399.46)
nReset: J1.4 J10.15 U1.26 U2.55 U8.7 | length 5568.2
  Top Layer w7.87: J10.15@4123.22,5414.96 4170.99,5462.73 4362.09,5462.73 4551.74,5652.37 4843.02,5652.37 4843.31,5652.66 ; v1(4305,6190.94) 4344.37,6151.57 U1.26@4393.7,6151.57 ; v1(4775.91,6073.5) 4777.65,6071.75 4777.65,5949.88 4827.76,5899.77 4827.76,5732.05 4843.31,5716.5 4843.31,5563.9 v1(4909.62,5497.59) ; v1(6303.15,6515.75) 6303.23,6515.66 6303.23,6249.52 6356.5,6196.26 U8.7@6375.98,6196.26
  Signal Layer 1 w7.87: J1.4@3996.06,6240.16 4039.84,6240.16 4089.06,6190.94 v1(4305,6190.94) ; v1(4724.44,6200.79) 4785.72,6139.5 4785.72,6097.21 4778.99,6090.48 4778.99,6076.59 v1(4775.91,6073.5)
  Signal Layer 2 w7.87: v1(4305,6190.94) 4338.46,6224.41 4506.08,6224.41 ; v1(4724.44,6200.79) 4700.82,6224.41 4506.08,6224.41 ; v1(6303.15,6515.75) 6257.97,6560.93 5053.24,6560.93 5001.68,6612.5 4557.77,6612.5 4506.08,6560.8 4506.08,6224.41
  Bottom Layer w7.87: v1(4909.62,5497.59) 4909.62,5391.42 U2.55@5208,5093.04
PAIR0_N: J3.3 M1.10 | length 1780.4
  Top Layer w8: M1.10@5606.3,5741.73 5606.3,5709.87 5717.62,5598.55 5996.06,5598.55 6007.79,5610.28 6094.57,5610.28 6106.3,5598.55 6417.76,5598.55 6447.36,5628.15 6492.88,5628.15 6522.48,5598.55 6604.26,5598.55 6633.86,5628.15 6677.49,5628.15 6707.09,5598.55 6801.22,5598.55 6830.71,5628.04 6830.71,5663.41 6864.46,5697.16 6899.84,5697.16 6988.19,5785.52 6988.19,5806.28 7020.91,5839 7076.36,5839 7105.32,5810.04 J3.3@7105.51,5810.04
PAIR0_P: J3.2 M1.12 | length 1783.3
  Top Layer w8: M1.12@5590.55,5741.73 5590.55,5703.35 5711.1,5582.8 6807.75,5582.8 6984.98,5760.04 J3.2@7205.51,5760.04 J3.2@7200.84,5764.71
PAIR1_N: J3.7 M1.6 | length 1789.9
  Top Layer w8: M1.6@5637.8,5741.73 5637.8,5711.8 5712.7,5636.9 6402.33,5636.9 6434.77,5669.33 6514.33,5669.33 6546.77,5636.9 6595.13,5636.9 6630.74,5672.51 6670.7,5672.51 6706.31,5636.9 6775.9,5636.9 6797.88,5658.88 6797.88,5689 6827.16,5718.28 ; 6834.3,5718.28 6827.16,5718.28 ; v1(6963,5824) 6857.28,5718.28 6827.16,5718.28
  Signal Layer 1 w8: v1(6963,5824) 7103.61,5964.61 7103.61,6008.14 J3.7@7105.51,6010.04
PAIR1_P: J3.4 M1.4 | length 1784.5
  Top Layer w8: M1.4@5653.54,5741.73 5653.61,5741.67 5653.61,5725.56 5722.6,5656.56 6394.19,5656.56 6426.63,5689 6522.48,5689 6554.91,5656.56 6589.46,5656.56 6621.9,5689 6684.56,5689 6717,5656.56 6752.93,5656.56 6772.05,5675.68 6772.05,5710.63 6800.09,5738.67 6835.04,5738.67 6854.67,5758.3 6854.67,5808.41 6906.3,5860.04 6956.41,5860.04 J3.4@7205.51,5860.04
PAIR2_N: J3.6 M1.9 | length 1722.3
  Top Layer w8: M1.9@5606.3,5862.99 5606.3,5916.52 5668.12,5978.35 v1@6994.6,5978.35
  Bottom Layer w8: v1(6996,5978) 7013.96,5960.04 7129.42,5960.04 7163.46,5926 7188.06,5926 7192.75,5930.69 7192.75,5933.69 7205.51,5946.46 J3.6@7205.51,5960.04
PAIR2_P: J3.5 M1.11 | length 1727.3
  Top Layer w8: M1.11@5590.55,5862.99 5590.55,5923.05 5661.6,5994.09 6963.39,5994.09 v1(6994.6,6025.31)
  Bottom Layer w8: v1(6994.6,6025.31) 6973.99,6004.7 6973.99,5968.88 6998.61,5944.26 7071.29,5944.26 J3.5@7105.51,5910.04
PAIR3_N: J3.9 M1.5 | length 1791.8
  Top Layer w8: M1.5@5637.8,5862.99 5637.8,5905.33 5669.25,5936.79 5748.92,5936.79 5775.04,5910.67 5899.08,5910.67 5925.2,5936.79 6005.91,5936.79 6034.69,5908 6126.72,5908 6155.51,5936.79 6471,5936.79 6497.11,5910.67 6563.65,5910.67 6589.76,5936.79 6739.17,5936.79 6760.14,5915.82 6814.08,5915.82 6835.04,5936.79 7010.99,5936.79 7037.4,5963.2 7037.4,6126 7042.09,6130.68 7075.73,6130.68 7096.37,6110.04 J3.9@7105.51,6110.04
PAIR3_P: J3.8 M1.3 | length 1781.8
  Top Layer w8: M1.3@5653.54,5862.99 5653.54,5892.31 5653.54,5895.56 5673.81,5915.82 5748.92,5915.82 5772.74,5892 5901.37,5892 5925.2,5915.82 6004.53,5915.82 6028.35,5892 6131.69,5892 6155.51,5915.82 6471,5915.82 6494.82,5892 6571.3,5892 6595.13,5915.82 6732.28,5915.82 6747.11,5901 6820.22,5901 6835.04,5915.82 7034.75,5915.82 7064.08,5945.16 7064.08,6036.98 7064.71,6036.98 7092.45,6064.71 7200.84,6064.71 J3.8@7205.51,6060.04
SDCard_MISO: J7.7 M1.40 | length 2872.5
  Top Layer w7.87: M1.40@5370.08,5741.73 5370.08,5578.67 5445,5503.75 6208.73,5503.75 6270.25,5442.23 6270.25,5406.66 v1(6297.92,5378.99) ; v1(7500,5344.49) 7500,5324.8 7663.39,5161.42 J7.7@7714.57,5161.42
  Bottom Layer w7.87: v1(6297.92,5378.99) 6321.94,5378.99 6464.4,5521.45 6554.14,5521.45 ; 6554.06,5521.37 6554.14,5521.45 ; v1(7500,5344.49) 7500,5415.51 7394.06,5521.45 6554.14,5521.45
SDCard_MOSI: J7.3 M1.44 | length 2869.7
  Top Layer w7.87: M1.44@5338.58,5741.73 5338.58,5590.55 5439.26,5489.87 6200.86,5489.87 6256.37,5434.36 6256.37,5381.03 6271.23,5366.17 v1(6271.23,5362.2) ; v1(7578.74,5350.39) 7594.49,5334.65 J7.3@7714.57,5334.65
  Bottom Layer w7.87: v1(6271.23,5362.2) 6271.23,5413.56 6406.87,5549.2 7409.92,5549.2 7565.39,5393.73 7565.39,5363.08 7578.07,5350.39 v1(7578.74,5350.39)
SDCard_nCS: J7.2 M1.39 R11.2 | length 2952.2
  Top Layer w7.87: v1(5356.96,5912.83) 5356.96,5911.54 5370.08,5898.42 M1.39@5370.08,5862.99 ; v1(5708.66,5452.76) v1(5874.02,5452.76) ; v1(7594.88,5383.86) 7600.79,5377.95 J7.2@7714.57,5377.95
  Signal Layer 1 w7.87: v1(5356.96,5912.83) 5356.96,5839.4 5334.65,5817.09 5334.65,5697.86 5382.2,5650.31 5555.25,5650.31 5612.66,5592.91 5612.66,5548.76 v1(5708.66,5452.76)
  Bottom Layer w7.87: v1(5874.02,5452.76) 5984.53,5563.27 6253.8,5563.27 6253.99,5563.07 7415.67,5563.07 v1(7594.88,5383.86) R11.2@7637.8,5383.86
SDCard_SCLK: J7.5 M1.38 | length 2787.7
  Top Layer w7.87: M1.38@5385.83,5741.73 5385.83,5582.55 5450.75,5517.62 6214.47,5517.62 6299.32,5432.78 6299.32,5409.26 v1(6299.63,5408.96) ; v1(7537.4,5344.49) 7537.4,5324.8 7614.17,5248.03 J7.5@7714.57,5248.03
  Bottom Layer w7.87: v1(6299.63,5408.96) 6426,5535.33 6451.98,5535.33 7399.81,5535.33 7537.4,5397.73 v1(7537.4,5344.49)
SWCLK: J1.2 U1.31 | length 589.9
  Top Layer w7.87: J1.2@3996.06,6338.58 4078.87,6255.77 4078.87,6171.13 4226.38,6023.62 4344.37,6023.62 4373.48,6052.73 4393.28,6052.73 U1.31@4393.7,6053.15
SWDIO: J1.3 U1.32 | length 555.5
  Top Layer w7.87: J1.3@3996.06,6289.37 4065,6220.43 4065,6165.38 4220.63,6009.75 4350.12,6009.75 4373.45,6033.08 4393.31,6033.08 U1.32@4393.7,6033.46
USB_N: M1.103 R10.1 | length 1790.6
  Top Layer w8: M1.103@5653.61,4527.62 M1.103@5653.54,4527.56 5653.54,4556.24 5655.51,4558.2
  Top Layer w10.63: 5655.51,4558.2 5655.51,4587.65 5691.38,4623.52 6417.76,4623.52 6466.28,4575 6519.88,4575 6539.37,4594.49 6616,4594.49 6635.49,4575 6687.6,4575 6707.09,4594.49 6791.34,4594.49 6810.83,4575 6862.94,4575 6882.43,4594.49 R10.1@7309.84,4594.49
USB_P: M1.105 R9.1 | length 1787.8
  Top Layer w7.87: 5635,4561 5637.8,4558.2 M1.105@5637.8,4527.56
  Top Layer w10.63: 5635,4561 5635,4597.2 5682.58,4644.78 6426.57,4644.78 6455.6,4615.75 7256.17,4615.75 7281.27,4640.84 R9.1@7309.84,4640.84
WatchDog: M1.50 U8.6 | length 3404.1
  Top Layer w7.87: v1(5031.37,5484.61) 5032.26,5483.72 5189.08,5483.72 5291.34,5585.97 M1.50@5291.34,5741.73 ; v1(6204.72,6488.19) 6204.72,6322.91 6330.98,6196.65 6330.98,6171.77 6356.5,6146.26 U8.6@6375.98,6146.26
  Signal Layer 1 w7.87: v1(5015.75,6011.81) 4992.76,5988.82 4992.76,5523.22 v1(5031.37,5484.61)
  Signal Layer 2 w7.87: v1(5015.75,6011.81) 4983.1,5979.16 4966.38,5979.16 4935.87,6009.67 4935.87,6026.92 4949.26,6040.31 4949.26,6269.24 4904.53,6313.98 4904.53,6507.08 4944.51,6547.05 6145.86,6547.05 v1(6204.72,6488.19)
pads on no net: J3. J4.1 J4.4 J6.L1 J6.R1 J7.1 J7.8 J9.41 J9.42 J9.43 J9.44 J9.45 J9.46 J9.47 J9.48 J9.49 J9.50 J9.51 J9.52 J9.53 J9.54 J9.55 J9.56 J10.14 J10.16 J10.19 J10.20 J10.25 J10.26 J11.31 J11.32 J11.51 J11.52 J11.61 J11.62 J12.4 M1.16 M1.18 M1.19 M1.20 M1.21 M1.35 M1.36 M1.57 M1.61 M1.62 M1.63 M1.64 M1.67 M1.68 M1.69 M1.70 M1.72 M1.73 M1.75 M1.76 M1.80 M1.82 M1.88 M1.89 M1.90 M1.91 M1.92 M1.94 M1.95 M1.96 M1.97 M1.99 M1.100 M1.101 M1.102 M1.104 M1.106 M1.109 M1.110 M1.111 M1.112 M1.115 M1.116 M1.117 M1.118 M1.121 M1.122 M1.123 M1.124 M1.126 M1.127 M1.128 M1.129 M1.130 M1.133 M1.134 M1.135 M1.136 M1.139 M1.140 M1.141 M1.142 M1.143 M1.145 M1.146 M1.147 M1.148 M1.149 M1.151 M1.152 M1.153 M1.154 M1.157 M1.158 M1.159 M1.160 M1.163 M1.164 M1.165 M1.166 M1.169 M1.170 M1.171 M1.172 M1.175 M1.176 M1.177 M1.178 M1.181 M1.182 M1.183 M1.184 M1.187 M1.188 M1.189 M1.190 M1.193 M1.194 M1.195 M1.196 M1.199 M1.200 MH1.2775 MH2.2775 MH3.2775 MH4.2775 Q2.2 Q2.4 U2.129 U4.1 U4.3 U4.4 U5.18 U5.19 U5.21 U5.22 U5.23 U5.24 U5.28 U5.29 U5.30 U5.32 U5.33 U5.34 U5.36 U5.40 U5.41 U5.43 U5.44 U5.45 U5.46 U5.53 U5.54 U5.55 U5.57 U5.58 U5.59 U5.60 U6.7 U8.5

## Polygon pours and split planes (outlines as drawn)
GND on Top Layer "NONET_L01_P000" (solid, remove dead copper, shelved, pour order 0): 3937.01,6692.91 7874.02,6692.91 7874.02,3937.01 3937.01,3937.01
GND on Signal Layer 1 "NONET_L02_P001" (solid, remove dead copper, shelved, pour order 1): 3937.01,6692.91 7874.02,6692.91 7874.02,3937.01 3937.01,3937.01
GND on Signal Layer 2 "NONET_L03_P003" (solid, remove dead copper, shelved, pour order 3): 3937.01,6692.91 7874.02,6692.91 7874.02,3937.01 3937.01,3937.01
GND on Bottom Layer "NONET_L04_P004" (solid, remove dead copper, shelved, pour order 4): 3937.01,6692.91 7874.02,6692.91 7874.02,3937.01 3937.01,3937.01

## Keep-outs
Keep-Out Layer:
  the board outline again, w5.98

## Other copper
Top Layer:
  rectangle net +3.3V_CM: 5002.31,5645.67 5028.9,5759.71
  region net +5.0V_CM: 4987.83,5881.89 5075.02,5881.89 5075.02,5803.15 5039.34,5767.47 4881.77,5767.47 4881.77,5827.11 4882.04,5827.39 4987.55,5827.39

## Silkscreen, mask and mechanical layers (free items; w line width, h text height)
Top Overlay:
  text "KOM ACB23 4009 V0.11" at 6647,6545.28 h59.06
  text "2023/03 v0.11" at 7305.63,4042.47 h29.53
Mechanical 1:
  the board outline again, w5.98

## Text inside footprints (layer, text, board x,y; h text height)
J8: Bottom Overlay "+" at 6443.7,4960.63 h60
M1: Top Overlay "Compute Module 4" at 4330.01,5322.25 h30 r270